# EAGLE board LED Power and Digital (EAGLE 9.7.0)
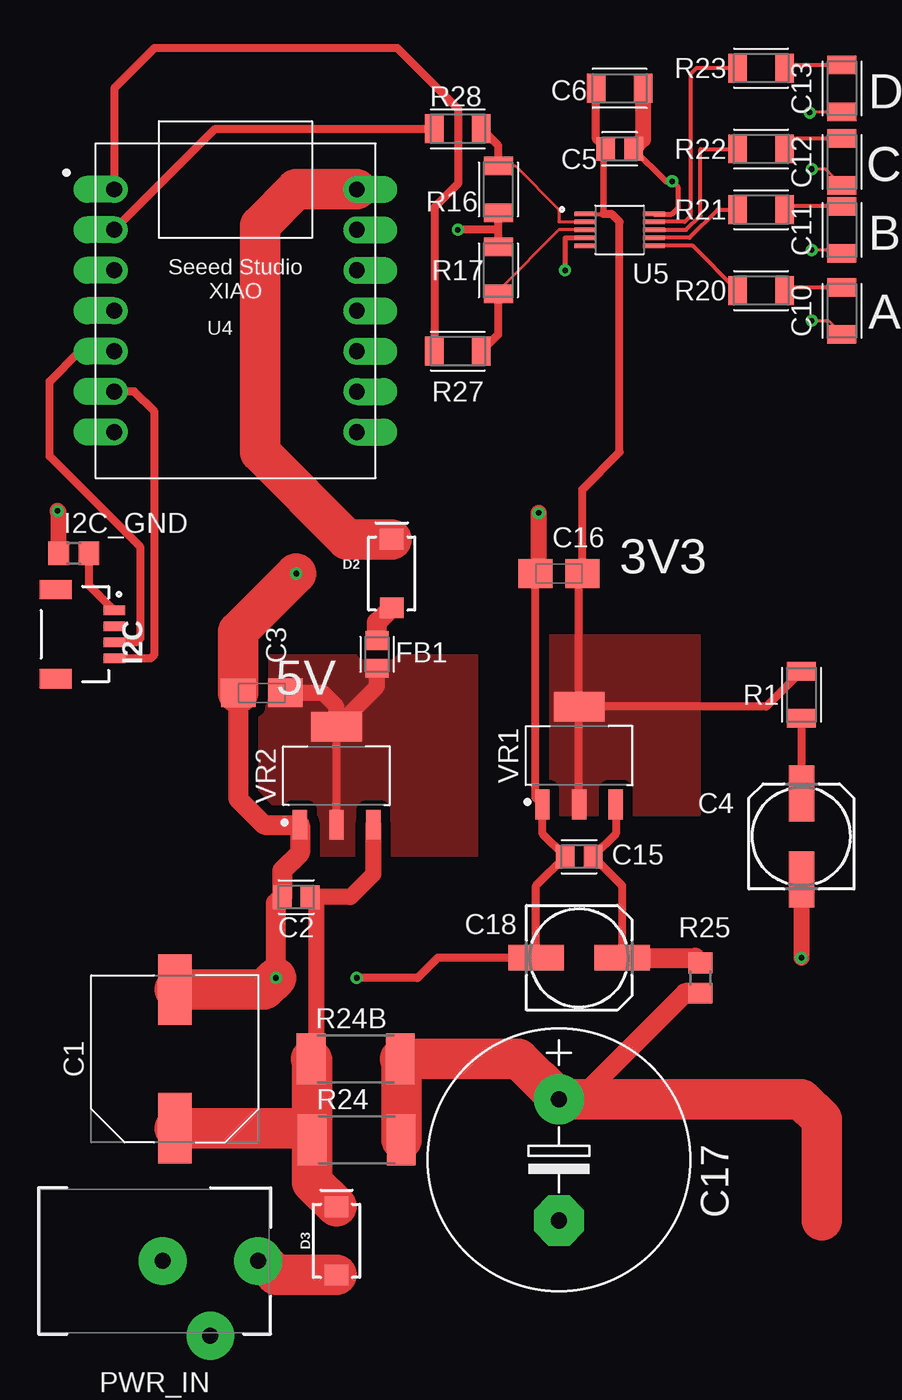
[diagram p0: board, top side]
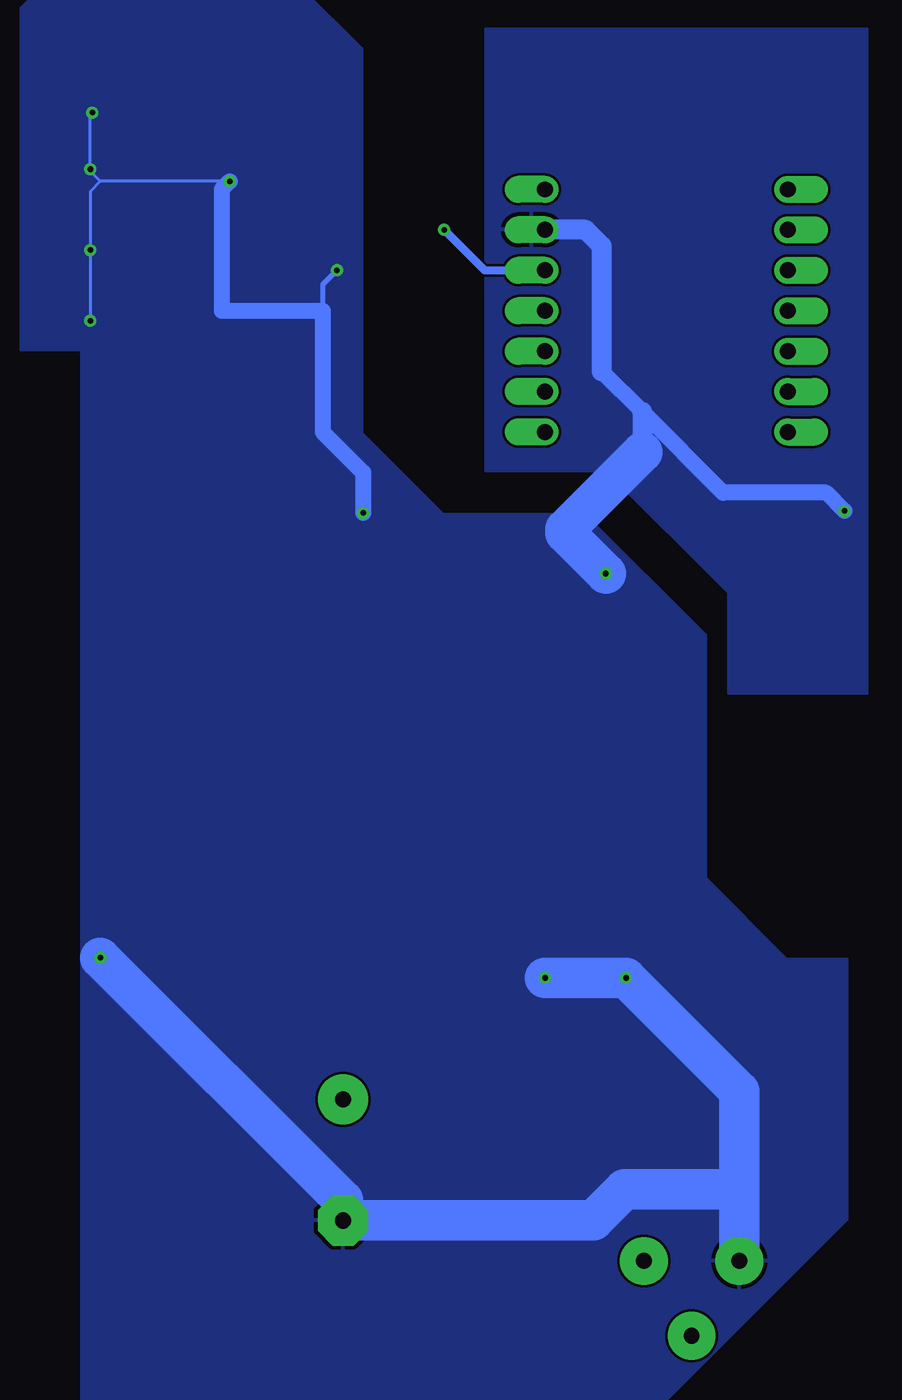
[diagram p1: board, bottom side, seen from below]

No outline drawn. Coordinates in mm, seen from the top.
Copper layers (1*16): Top 0.035mm / dielectric 1.5mm / Bottom 0.035mm
Design rules "Fusion Electronics Design Rules": minimum track width 6mil, minimum drill 0.35mm, track to track 6mil, track to pad 6mil, pad to pad 6mil, via to via 6mil, smd to smd 6mil, copper to edge 40mil, drill to drill 6mil, minimum pad ring 10mil, minimum via ring 8mil, stop-mask expansion 4mil, vias tented up to drill 32mil, thermal gap 10mil

## Footprints (pad centres in the part's own frame; a part is rotated, then mirrored left to right if it is on the bottom)
CAPAE1030X1050N = smd 4.416 x 2.115: 1 -4.353,0; 2 4.353,0
CAPC2012X110 = smd 1.165 x 1.465: 1 -0.875,0; 2 0.875,0
A/3216-18W = smd 2.15 x 1.8: + 1.475,0; - -1.475,0
153CLV-0605 = smd 3.5 x 1.6: + 2.7,0; - -2.7,0
CAPC3216X135 = smd 1.165 x 1.815: 1 -1.475,0; 2 1.475,0
E7,5-16 = drill 1.016 pad 3.15: + -3.81,0 | drill 1.016 pad 3.15 octagon: - 3.81,0
SMA-DIODE = smd 1.27 x 1.47: A -2.15,0; C 2.15,0
BEADC2012X105N = smd 1.165 x 1.465: 1 -0.875,0; 2 0.875,0
JST04_1MM_RA = smd 0.6 x 1.35: 1 -1.5,0; 2 -0.5,0; 3 0.5,0; 4 1.5,0 | smd 1.2 x 2: NC1 2.8,-3.675; NC2 -2.8,-3.675
R0805 = smd 1.3 x 1.5: 1 -0.95,0; 2 0.95,0
PJ-102AH = drill 1 pad 3 slot 1.6 rotated 90: 1 -6.5,0; 2 -0.5,0 | drill 1 pad 3 slot 1.6: 3 -3.5,4.7
RESC3216X70 = smd 1.165 x 1.815: 1 -1.475,0; 2 1.475,0
R2512 = smd 1.8 x 3.2: 1 -2.8,0; 2 2.8,0
XIAO-GENERIC-HYBRID-MODULE14P-2.54-21X17.8MM = drill 1 pad 1.7 offset: 1 -7.62,7.62; 2 -7.62,5.08; 3 -7.62,2.54; 4 -7.62,0; 5 -7.62,-2.54; 6 -7.62,-5.08; 7 -7.62,-7.62; 8 7.62,-7.62; 9 7.62,-5.08; 10 7.62,-2.54; 11 7.62,0; 12 7.62,2.54; 13 7.62,5.08; 14 7.62,7.62
SOP50P490X110-10N = smd 1.47 x 0.28: 1 -2.15,1; 2 -2.15,0.5; 3 -2.15,0; 4 -2.15,-0.5; 5 -2.15,-1; 6 2.15,-1; 7 2.15,-0.5; 8 2.15,0; 9 2.15,0.5; 10 2.15,1
SOT230P700X170-4 = smd 1.86 x 0.898: 1 -3.075,2.3; 2 -3.075,0; 3 -3.075,-2.3 | smd 1.86 x 3.189: 4 3.075,0

## Placement (x,y rotation side)
C1  470uF  [CAPAE1030X1050N]  10.16,30.48 90 top
C2  330nF  [CAPC2012X110]  17.78,40.64 180 top
C3  10uF  [A/3216-18W]  15.62,53.47 0 top
C4  100uF  [153CLV-0605]  49.53,44.45 90 top
C5  100nF  [CAPC2012X110]  38.1,87.63 0 top
C6  10uF  [CAPC3216X135]  38.1,91.44 0 top
C10  10uF  [CAPC3216X135]  52.07,77.47 90 top
C11  10uF  [CAPC3216X135]  52.07,82.55 90 top
C12  10uF  [CAPC3216X135]  52.07,86.82 90 top
C13  10uF  [CAPC3216X135]  52.07,91.44 90 top
C15  100nF  [CAPC2012X110]  35.56,43.18 180 top
C16  10uF  [A/3216-18W]  34.29,60.96 0 top
C17  2200uF  [E7,5-16]  34.29,24.13 270 top
C18  100uF  [153CLV-0605]  35.56,36.83 0 top
D2  1A/40V/500mV  [SMA-DIODE]  23.78,60.96 90 top
D3  3A/40V/500mV  [SMA-DIODE]  20.32,19.05 90 top
FB1  600R @ 100MHz  [BEADC2012X105N]  22.86,55.88 90 top
I2C  QWIIC_RIGHT_ANGLE  [JST04_1MM_RA]  6.35,57.15 270 top
I2C_GND  0  [R0805]  3.81,62.23 0 top
PWR_IN  PJ-102AH  [PJ-102AH]  8.89,17.78 180 top
R1  100R  [RESC3216X70]  49.53,53.34 90 top
R16  10k  [RESC3216X70]  30.48,85.09 90 top
R17  10k  [RESC3216X70]  30.48,80.01 90 top
R20  1k  [RESC3216X70]  46.99,78.74 180 top
R21  1k  [RESC3216X70]  46.99,83.82 180 top
R22  1k  [RESC3216X70]  46.99,87.63 180 top
R23  1k  [RESC3216X70]  46.99,92.71 180 top
R24  2.2  [R2512]  21.59,25.4 0 top
R24B  2.2  [R2512]  21.52,30.48 0 top
R25  22  [R0805]  43.18,35.56 90 top
R27  220  [RESC3216X70]  27.94,74.93 180 top
R28  220  [RESC3216X70]  27.94,88.9 180 top
U4  XIAO-THRUHOLEHYBRID-SMT-THT  [XIAO-GENERIC-HYBRID-MODULE14P-2.54-21X17.8MM]  13.97,77.47 0 top
U5  MCP4728-E/UN  [SOP50P490X110-10N]  38.1,82.55 0 top
VR1  LD1117_3v3  [SOT230P700X170-4]  35.56,49.53 90 top
VR2  LD1117_5V  [SOT230P700X170-4]  20.32,48.26 90 top

## Library data of the parts
C1 = Capacitor; CATEGORY_L1: Capacitor; CATEGORY_L2: Aluminum Electrolytic Capacitors; CATEGORY_L3: Radial Can; PACKAGE: Surface Mount; PACKAGE_SIZE: 10.5MM
C2 C5 C15 = Capacitor; CATEGORY_L1: Capacitor; CATEGORY_L2: Ceramic Capacitors; CATEGORY_L3: MLCC; PACKAGE: Surface Mount; PACKAGE_SIZE: 0805
C3 C4 C16-C18 = rcl; SPICEPREFIX: C
C6 C10-C13 = Capacitor; CATEGORY_L1: Capacitor; CATEGORY_L2: Ceramic Capacitors; CATEGORY_L3: MLCC; PACKAGE: Surface Mount; PACKAGE_SIZE: 1206
D2 = SparkFun-DiscreteSemi; PROD_ID: DIO-08053
D3 = SparkFun-DiscreteSemi; PROD_ID: DIO-09886
FB1 = Filter; CATEGORY_L1: Ferrite Bead; DESCRIPTION: Generic Ferrite Bead 0805 (2012 Metric); PACKAGE: Surface Mount; PACKAGE_SIZE: 0805
I2C = SparkFun-Connectors; PROD_ID: CONN-13694
I2C_GND R24 R24B R25 = rcl; SPICEPREFIX: R
PWR_IN = Connector; CATEGORY_L1: Connectors; CATEGORY_L2: Power Connectors; CATEGORY_L3: DC Jack Male; DATASHEET: https://www.sameskydevices.com/product/resource/pj-102ah.pdf; DESCRIPTION: Power Barrel Connector Jack 2.00mm ID (0.079") & 5.50mm OD (0.217") Through Hole & Right Angle; MANUFACTURER: Same Sky; MPN: PJ-102AH; OPERATING_TEMPERATURE: -25°C ~ 85°C; PACKAGE: Through Hole; PACKAGE_SIZE: NA; PART_STATUS: Active; PITCH: NA; ROHS: Compliant; SERIES: PJ-102
R1 R16 R17 R20-R23 R27 R28 = Resistor; CATEGORY_L1: Resistors; DESCRIPTION: Chip Resistor 3.20 X 1.60 X 0.70 mm body 1206(3216-METRIC) Package; PACKAGE: Surface Mount; PACKAGE_SIZE: 1206
U4 = Seeed Studio XIAO Series
U5 = MCP4728-E_UN; AVAILABILITY: In Stock; CHECK_PRICES: https://www.snapeda.com/parts/MCP4728-E/UN/Microchip+Technology/view-part/?ref=eda; DESCRIPTION: Microchip 4-channel 12 bit Serial DAC 10-Pin MSOP | Microchip Technology Inc. MCP4728-E/UN; MF: Microchip; MP: MCP4728-E/UN; PACKAGE: MSOP-10 Microchip; PRICE: None; PURCHASE-URL: https://www.snapeda.com/api/url_track_click_mouser/?unipart_id=43468&manufacturer=Microchip&part_name=MCP4728-E/UN&search_term=mcp4728; SNAPEDA_LINK: https://www.snapeda.com/parts/MCP4728-E/UN/Microchip+Technology/view-part/?ref=snap
VR1 VR2 = IC_Power-Management; CATEGORY_L1: Power Management IC; CATEGORY_L2: Voltage Regulator; CATEGORY_L3: Linear & LDO Regulators; DESCRIPTION: Linear Voltage Regulator IC SOT-223; PACKAGE: Surface Mount; PACKAGE_SIZE: SOT-223; SERIES: LM1117

## Nets
2: I2C.2
3V3_A: C5.1 C6.1 C16.+ R1.2 U5.1 VR1.2 VR1.4
3V3_BIAS: C4.+ R1.1
5V_RAW: C3.+ FB1.1 VR2.2 VR2.4
5V_XIAO: D2.A FB1.2
12V_RAW: C1.1 C2.1 D3.C R24.1 R24B.1 VR2.3
+3V3_XIAO: R16.1 R17.2 U4.12
+12: D3.A PWR_IN.1
DAC_A: C10.2 R20.1
DAC_B: C11.2 R21.1
DAC_C: C12.2 R22.1
DAC_D: C13.2 R23.1
GND: C1.2 C2.2 C3.- C4.- C5.2 C6.2 C10.1 C11.1 C12.1 C13.1 C15.2 C16.- C17.- C18.- I2C_GND.1 PWR_IN.2 U4.13 U5.4 U5.10 VR1.1 VR2.1
LED_SUPPLY: C17.+ R24.2 R24B.2 R25.1
N$1: D2.C U4.14
N$2: I2C.1 I2C_GND.2
N$3: C15.1 C18.+ R25.2 VR1.3
N$22: R16.2 R28.1 U5.2
N$23: R17.1 R27.1 U5.3
N$24: R20.2 U5.6
N$25: R21.2 U5.7
N$26: R22.2 U5.8
N$27: R23.2 U5.9
SCL_DAC: R28.2 U4.2
SCL_NET: I2C.4 U4.6
SDA_DAC: R27.2 U4.1
SDA_NET: I2C.3 U4.5

## Tracks (layer width: path | path; a pad name or v marks a point on that pad's centre or on a via)
3V3_A
  Top 0.254: 37.08,87.49 C5.1 | U5.1 37.07,83.55 37.08,83.57
  Top 0.406: 37.08,83.57 37.08,87.49
  Top 0.508: C5.1 36.62,88.23 C6.1 | VR1.2 VR1.4 | VR1.4 35.56,60.76 C16.+ 35.77,66.25 38.1,68.58 38.1,83.06 37.61,83.55 37.07,83.55 | R1.2 47.32,52.6 VR1.4
  pour Top (isolate 0.61, no thermals): 31.83,45.8 43.1,45.8 43.1,57.07 31.83,57.07
3V3_BIAS
  Top 0.508: R1.1 C4.+
5V_RAW
  Top 0.508: VR2.2 VR2.4
  Top 1.016: FB1.1 22.86,53.88 VR2.4 20.32,52.6 19.46,53.47 C3.+
  pour Top (isolate 0.61, no thermals): 15.32,43.26 29.13,43.26 29.13,55.8 15.32,55.8
5V_XIAO
  Top 1.27: FB1.2 22.86,57.89 D2.A
12V_RAW
  Top 1.016: 18.33,30.74 18.59,30.48 R24B.1 | 18.79,30.41 19.05,30.67 19.05,40.24 C2.1 21.2,40.64 22.62,42.06 VR2.3
  Top 2.54: D3.C 18.79,22.73 R24.1 | R24.1 18.79,30.41 R24B.1 | C1.1 18.06,26.13 R24.1
+3V3_XIAO  (via drill 0.35)
  Top 0.508: R17.2 30.48,82.55 | 30.48,82.55 R16.1 | 30.48,82.55 v27.94,82.55
  Bottom 0.508: v27.94,82.55 25.4,80.01 U4.12
+12
  Top 2.54: PWR_IN.1 15.63,17.78 16.51,16.9 D3.A
DAC_A
  Top 0.254: R20.1 48.67,78.94 C10.2
DAC_B
  Top 0.254: R21.1 48.67,84.03 C11.2
DAC_C
  Top 0.254: R22.1 49.13,88.29 C12.2
DAC_D
  Top 0.254: R23.1 48.67,92.92 C13.2
GND  (via drill 0.35)
  Top 0.2: v50.04,89.92 50.09,89.97 C13.1 | v50.16,76.83 51.23,76.83 C10.1 | C11.1 51.87,81.28 v50.16,81.28 | C12.1 51.05,86.36 v50.16,86.36
  Top 0.305: U5.10 41.4,83.55 41.78,83.93 41.78,85.22 v41.4,85.6 | U5.4 34.67,82.04 v34.67,80.01
  Top 0.406: v41.4,85.6 41.01,85.6 C5.2
  Top 0.508: C16.- 32.81,46.9 VR1.1 33.26,44.6 C15.2 32.86,41.35 C18.- 26.67,36.83 25.4,35.56 v21.59,35.56
  Top 1.016: C6.2 39.58,88.23 C5.2 | C4.- v49.53,36.83 | v33.02,64.77 33.02,61.16 C16.- | I2C_GND.1 2.86,64.83 v2.79,64.9
  Top 1.27: v16.51,35.56 16.51,40.24 C2.2 16.91,42.3 18.02,43.42 VR2.1 15.78,45.19 14.15,46.81 C3.-
  Top 2.54: v16.51,35.56 15.78,34.83 C1.2 | C3.- 14.15,57.33 v17.78,60.96
  Bottom 0.2: v41.4,85.6 49.53,85.6 | 49.53,85.6 50.16,86.23 v50.16,86.36 50.16,89.79 v50.04,89.92 | 49.53,85.6 50.16,84.96 v50.16,81.28 v50.16,76.83
  Bottom 0.305: v34.67,80.01 35.56,79.12 35.56,77.47
  Bottom 1.016: v41.4,85.6 41.91,85.09 41.91,77.47 35.56,77.47 35.56,69.85 33.02,67.31 v33.02,64.77 | v2.79,64.9 3.94,66.04 10.41,66.04 15.49,71.12 18.03,73.66
  Bottom 1.27: 15.49,71.12 15.49,68.58 | 18.03,73.66 18.03,81.53 19.05,82.55 U4.13
  Bottom 2.54: v49.53,36.83 34.29,21.59 C17.- 18.55,20.32 16.6,22.27 10.07,22.27 9.39,21.59 PWR_IN.2 9.39,28.44 v16.51,35.56 v21.59,35.56 | v17.78,60.96 20.32,63.5 20.32,63.75 15.49,68.58
  pour Bottom: 1.35,53.42 10.08,53.42 10.08,59.71 10.1,59.73 17.74,67.37 17.76,67.39 25.32,67.39 25.32,95.17 1.35,95.17
  pour Bottom: 11.49,41.87 6.39,36.77 6.37,36.75 2.62,36.75 2.62,20.35 19.72,3.25 50.72,3.25 50.72,74.95 50.74,74.97 50.76,74.99 50.78,75.01 54.53,75.01 54.53,96.49 53.31,97.71 36.86,97.71 33.1,93.95 33.1,69.83 33.08,69.81 27.98,64.71 27.96,64.69 19.08,64.69 11.51,57.12 11.51,41.89
LED_SUPPLY
  Top 1.27: C17.+ 35.56,27.94 42.23,34.61 R25.1
  Top 2.54: 33.02,29.21 C17.+ | C17.+ 49.53,27.94 50.8,26.67 50.8,20.32 | C17.+ 31.75,30.48 R24B.2 24.39,30.41 R24.2
N$1
  Top 2.54: U4.14 17.78,85.09 15.51,82.82 15.51,68.58 20.98,63.11 D2.C
N$2
  Top 0.508: I2C.1 4.76,60.24 I2C_GND.2
N$3
  Top 0.508: VR1.3 37.86,44.6 C15.1 38.26,41.35 C18.+
  Top 1.27: R25.2 42.86,36.83 C18.+
N$22
  Top 0.2: U5.2 34.29,83.05 34.29,83.82 31.55,86.56 R16.2
  Top 0.508: R28.1 30.48,87.83 R16.2
N$23
  Top 0.2: U5.3 34.29,82.55 30.48,78.74 R17.1
  Top 0.508: R17.1 30.48,76 R27.1
N$24
  Top 0.254: U5.6 42.7,81.55 R20.2
N$25
  Top 0.254: R21.2 44.26,83.82 42.49,82.05 U5.7
N$26
  Top 0.254: R22.2 43.18,87.63 43.18,83.45 42.27,82.55 U5.8
N$27
  Top 0.254: R23.2 42.93,92.71 42.55,92.33 42.55,83.39 42.2,83.05 U5.9
SCL_DAC
  Top 0.508: U4.2 12.7,88.9 R28.2
SCL_NET
  Top 0.508: I2C.4 8.66,55.65 8.89,55.88 8.89,71.12 7.62,72.39 U4.6
SDA_DAC
  Top 0.508: U4.1 6.35,91.44 8.89,93.98 24.13,93.98 27.96,90.15 27.96,85.46 26.46,83.96 R27.2
SDA_NET
  Top 0.508: I2C.3 7.75,56.65 8,56.9 8,62.61 2.29,68.33 2.29,73.03 4.19,74.93 U4.5

## Text on the board
tPlace: D | C | B | A | 3V3 | 5V